# Altium PCB Space_Test_Battery.PcbDoc
Units mm, origin at the board's own origin, x right, y up, seen from the top; angles counter-clockwise.
Board outline 100 x 60 mm, 2 copper layers (Top Layer, Bottom Layer); 59 components, 49 nets, 200 pads, 87 vias.
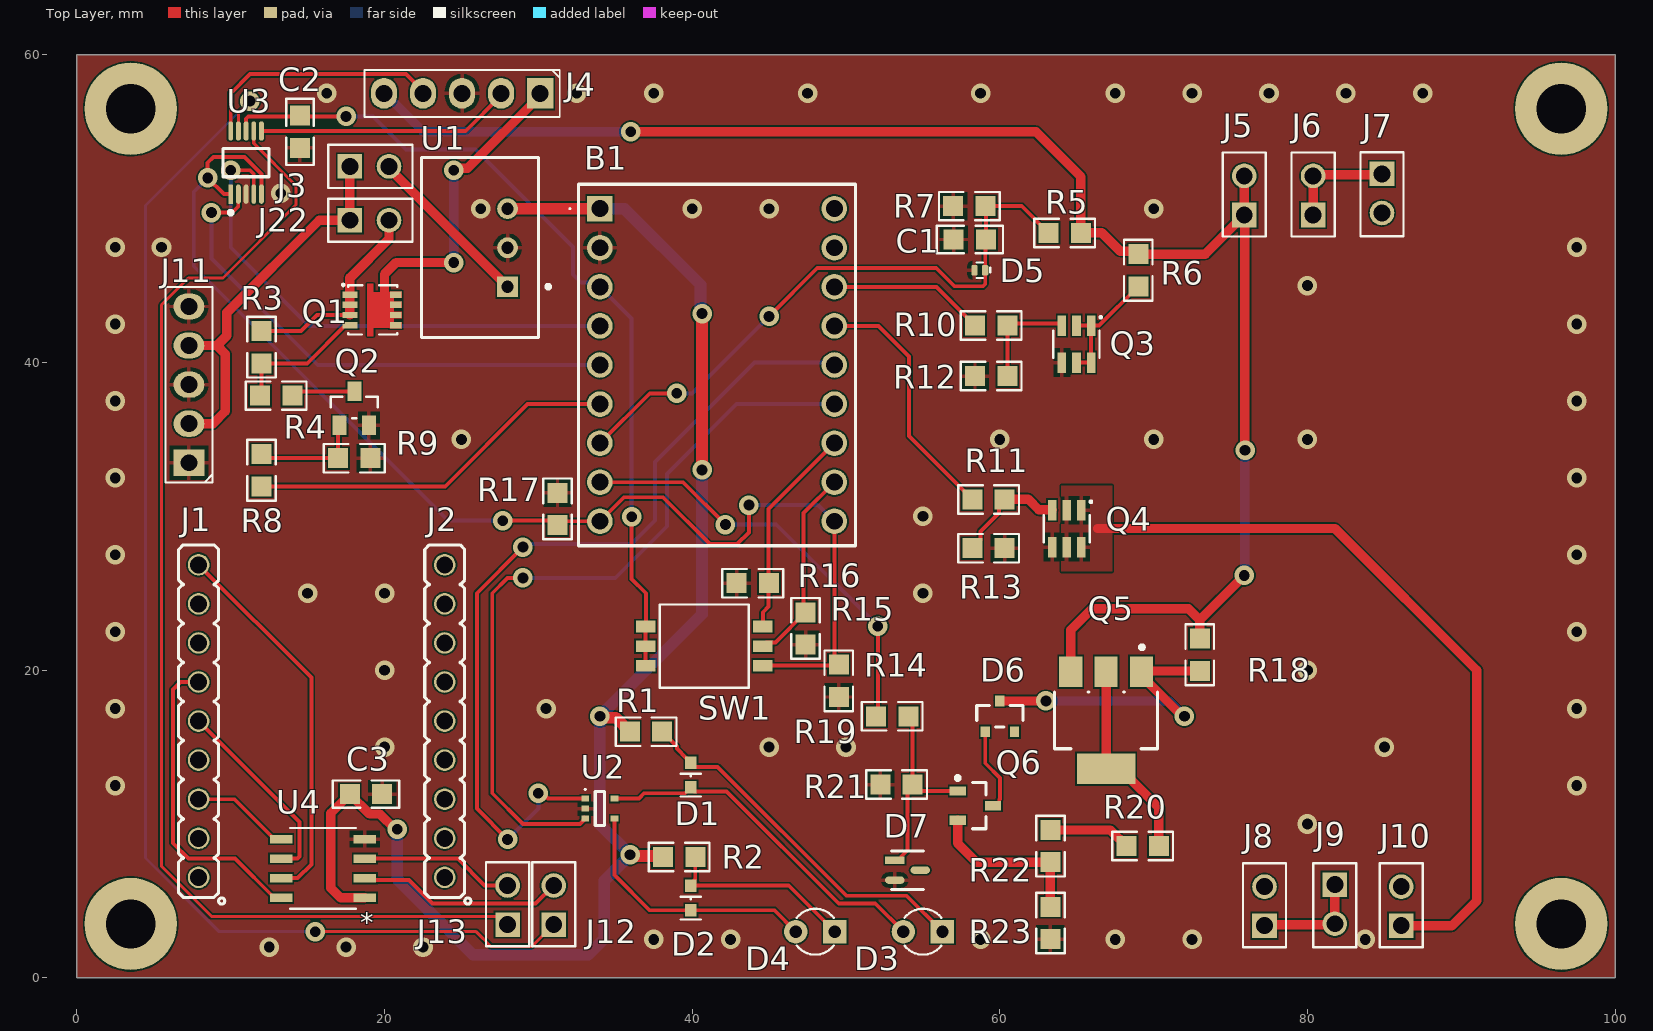
[diagram p0: Top Layer view]
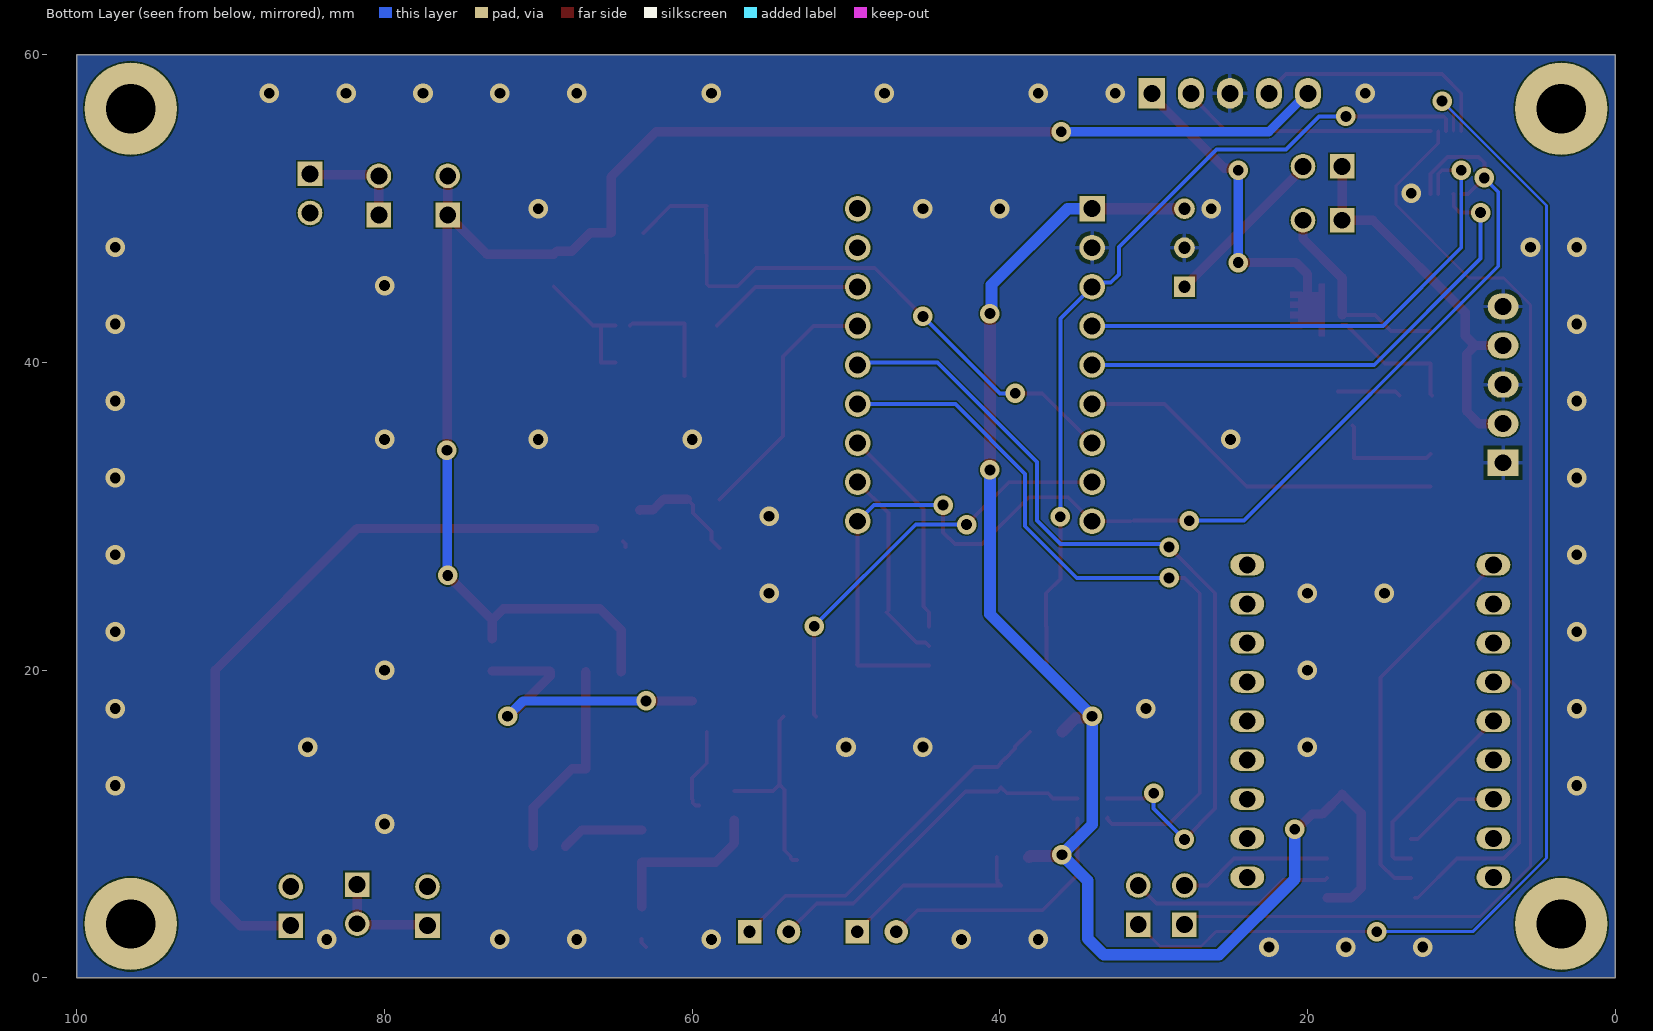
[diagram p1: Bottom Layer view, seen from below]

## Layer stack, top to bottom
Top Solder: solder mask 0.0102, Solder Resist, Dk 3.5
Top Layer: signal copper 0.0356
Dielectric 1: dielectric 0.32, FR-4, Dk 4.8
Bottom Layer: signal copper 0.0356
Bottom Solder: solder mask 0.0102, Solder Resist, Dk 3.5

## Board outline
0,0 0,60 100,60 100,0

## Design rules (kind name [scope] priority, off if disabled: settings)
AssemblyTestPointUsage [All] p1: isadvanced=TRUE
AssemblyTestpoint [All] p1: isadvanced=TRUE testpointundercomponent=TRUE minsize=1.016 maxsize=2.54 preferedsize=1.524 minholesize=0 maxholesize=1.016 preferedholesize=0.813 testpointgrid=0.025 usegrid=TRUE gridtolerance=0 allowsidetop=TRUE allowsidebottom=TRUE
Clearance Clearance_1 [OnMid vs OnMid] p1: gap=0.1 ignorepadtopadclearanceinfootprint=FALSE sourcerule=42 cellrowname=All cellrowtype=0 cellcolname=All cellcoltype=0 innerlayers=TRUE
Clearance Clearance_2 [(ExistsOnLayer('Top Layer') Or ExistsOnLayer('Bottom Layer')) vs (ExistsOnLayer('Top Layer') Or ExistsOnLayer('Bottom Layer'))] p2: gap=0.1 ignorepadtopadclearanceinfootprint=FALSE sourcerule=42 cellrowname=All cellrowtype=0 cellcolname=All cellcoltype=0 outerlayers=TRUE
Clearance [All] p3: gap=0.254 ignorepadtopadclearanceinfootprint=FALSE ismatrix=TRUE
ComponentClearance [All] p1: isadvanced=TRUE gap=0.254 collisioncheckmode=3 verticalgap=0.254 showdistances=FALSE
FabricationTestPointUsage [All] p1: isadvanced=TRUE valid=0 allowmultiple=FALSE
FabricationTestpoint [All] p1: isadvanced=TRUE side=3 testpointundercomponent=TRUE minsize=1.016 maxsize=2.54 preferedsize=1.524 minholesize=0 maxholesize=1.016 preferedholesize=0.813 testpointgrid=0.025 allowsidetop=TRUE allowsidebottom=TRUE usegrid=TRUE gridtolerance=0
FanoutControl Fanout_BGA [IsBGA] p1: isadvanced=TRUE bgadir=Out bgaviamode=Centered fanoutstyle=Auto fanoutdirection=Alternating viagrid=0.025 // Fanout_BGA (Default Rule)
FanoutControl Fanout_LCC [IsLCC] p2: isadvanced=TRUE bgadir=Out bgaviamode=Centered fanoutstyle=Auto fanoutdirection=Alternating viagrid=0.025 // Fanout_LCC (Default Rule)
FanoutControl Fanout_SOIC [IsSOIC] p3: isadvanced=TRUE bgadir=Out bgaviamode=Centered fanoutstyle=Auto fanoutdirection=Alternating viagrid=0.025 // Fanout_SOIC (Default Rule)
FanoutControl Fanout_Small [(CompPinCount < 5)] p4: isadvanced=TRUE bgadir=Out bgaviamode=Centered fanoutstyle=Auto fanoutdirection=OutThenIn viagrid=0.025 // Fanout_Small (Default Rule)
FanoutControl Fanout_Default [All] p5: isadvanced=TRUE bgadir=Out bgaviamode=Centered fanoutstyle=Auto fanoutdirection=Alternating viagrid=0.025 // Fanout_Default (Default Rule)
Height [All] p1: isadvanced=TRUE minheight=0 maxheight=25.4 prefheight=12.7
HoleSize [All] p1: isadvanced=TRUE absolutevalues=TRUE maxlimit=5.08 minlimit=0.025 maxpercent=80.000 minpercent=20.000
HoleToHoleClearance [All] p1: isadvanced=TRUE gap=0.254 allowstackedmicrovias=TRUE
LayerPairs [All] p1: isadvanced=TRUE enforce=TRUE
MinimumSolderMaskSliver [All] p1: isadvanced=TRUE minsoldermaskwidth=0.1
NetAntennae [All] p1: isadvanced=TRUE netantennaetolerance=0
PasteMaskExpansion [All] p1: isadvanced=TRUE expansion=0
PlaneClearance [All] p1: isadvanced=TRUE clearance=0.508
PlaneConnect [All] p1: isadvanced=TRUE planeconnectstyle=Direct reliefexpansion=0.508 reliefentries=4 reliefconductorwidth=0.254 reliefairgap=0.254
PolygonConnect [All] p1: connectstyle=Relief reliefconductorwidth=0.254 reliefentries=4 polygonreliefangle="90 Angle" airgapwidth=0.254
RoutingCorners [All] p1: isadvanced=TRUE cornerstyle=45-Degree minsetback=2.54 maxsetback=2.54
RoutingPriority [All] p1: isadvanced=TRUE routingpriority=0
RoutingVias [All] p1: holewidth=0.711 width=1.27 viastyle="Through Hole" minholewidth=0.711 minwidth=1.27 maxholewidth=0.711 maxwidth=1.27
ShortCircuit [All] p1: isadvanced=TRUE allowed=FALSE
SilkToSilkClearance [All] p1: isadvanced=TRUE silktosilkclearance=0.1
SilkToSolderMaskClearance [IsPad] p1: isadvanced=TRUE minsilkscreentomaskgap=0.1 clearancetoexposedcopper=TRUE
SolderMaskExpansion [All] p1: isadvanced=TRUE expansion=0.102 istentingtop=FALSE
SupplyNets "Schematic Supply Nets_3" [InNet('+5')] p1: isadvanced=TRUE voltage=0.000
SupplyNets "Schematic Supply Nets_2" [InNet('+Batter Input')] p2: isadvanced=TRUE voltage=0.000
SupplyNets "Schematic Supply Nets_1" [InNet('GND')] p3: isadvanced=TRUE voltage=0.000
SupplyNets "Schematic Supply Nets" [InNet('+12')] p4: isadvanced=TRUE voltage=0.000
UnRoutedNet [All] p1: isadvanced=TRUE
UnpouredPolygon [All] p1: isadvanced=TRUE
Width "Schematic Width Constraint_1" [InNetClass('switch')] p1: maxlimit=0.508 minlimit=0.254 preferedwidth=0.305 minimp=50.000000 maximp=50.000000 favimp=50.000000
Width "Schematic Width Constraint" [InNetClass('Power_thy')] p2: maxlimit=0.762 minlimit=0.254 preferedwidth=0.61 minimp=50.000000 maximp=50.000000 favimp=50.000000
Width [All] p3: maxlimit=0.8 minlimit=0.1 preferedwidth=0.254 minimp=50.000000 maximp=50.000000 favimp=50.000000
4 further rules are at their usual default settings.

## Classes and differential pairs
component class UART-USB: C3 J1 J2 J12 J13 U4
net class switch: NetB1_3 NetB1_11 NetB1_12
net class Power_thy: +5 +12 "+Batter Input" NetD6_3 NetJ4_2 NetQ5_2 NetQ6_2 NetR20_1
component class Current_Sink: D6 D7 Q5 Q6 R18 R19 R20 R21 R22 R23
component class ESP32: B1 C1 C2 D1 D2 D3 D4 D5 J3 J4 J5 J6 J7 J8 J9 J10 J11 J22 Q1 Q2 Q3 Q4 R1 R2 R3 R4 R5 R6 R7 R8 R9 R10 R11 R12 R13 R14 R15 R16 R17 SW1 U1 U2 U3

## Components (designator, comment, footprint, x,y, rotation, side; value= is the part's Value field where it differs from the comment)
B1 "ESP32-C6-Zero" ESP32C6Zero 34,50 r0 top
C1 "3.9nF" CAP0805H1520 58.05,48 r0 top
C2 "3.9nF" CAP0805H1520 14.5,55 r90 top
C3 "3.9nF" CAP0805H1520 18.796,11.938 r180 top
D1 "150060VS55040" LEDC160X75X41L40-green(WE) 39.912,13.191 r90 top
D2 "150060VS55040" LEDC160X75X41L40-green(WE) 39.912,5.191 r90 top
D3 "LED 3mm red" LED_THT_3mm 55,3 r90 top
D4 "LED 3mm red" LED_THT_3mm 48,3 r90 top
D5 "CPDV3V3A-HF" SOD882 58.7,46 r180 top
D6 "BZX84-C2.7-215" FP-SOT23-MFG 60,17 r90 top
D7 "BAV99W,135" FP-SOT323-IPC_B 54,7 r0 top
J1 "HDR_M_1X9" HDR_M_1X9 7.912,16.691 r90 top value=HDRM9
J2 "HDR_M_1X9" HDR_M_1X9 23.912,16.691 r90 top value=HDRM9
J3 "5-825433-0_2/50" PIN_HEADER_2_54mm_1_1mm_1x2 17.75,52.75 r0 top
J4 "Header 1x5" "Header 1x5 2.54mm" 30.12,57.5 r180 top
J5 "5-825433-0_2/50" PIN_HEADER_2_54mm_1_1mm_1x2 75.892,49.591 r90 top
J6 "5-825433-0_2/50" PIN_HEADER_2_54mm_1_1mm_1x2 80.368,49.591 r90 top
J7 "5-825433-0_2/50" PIN_HEADER_2_54mm_1_1mm_1x2 84.842,52.262 r270 top
J8 "5-825433-0_2/50" PIN_HEADER_2_54mm_1_1mm_1x2 77.206,3.389 r90 top
J9 "5-825433-0_2/50" PIN_HEADER_2_54mm_1_1mm_1x2 81.778,6.056 r270 top
J10 "5-825433-0_2/50" PIN_HEADER_2_54mm_1_1mm_1x2 86.096,3.389 r90 top
J11 "Header 1x5" "Header 1x5 2.54mm" 7.285,33.484 r90 top
J12 "5-825433-0_2/50" PIN_HEADER_2_54mm_1_1mm_1x2 31,3.46 r90 top
J13 "5-825433-0_2/50" PIN_HEADER_2_54mm_1_1mm_1x2 28,3.46 r90 top
J22 "5-825433-0_2/50" PIN_HEADER_2_54mm_1_1mm_1x2 17.75,49.25 r0 top
Q1 "SI7617DN-T1-GE3" PowerPAK1212-8 19.242,43.42 r0 top
Q2 "2N7002LT3G" SOT23 18.034,37.084 r90 top
Q3 "IRLMS2002" SOT23-6 64.982,41.196 r270 top
Q4 "IRLMS2002" SOT23-6 64.347,29.201 r270 top
Q5 "BCP51" FP-318H-MFG 66.912,16.744 r270 top
Q6 "BCX70G" INF-SOT23_N 58.412,11.191 r0 top
R1 "2k2" RES0805MD 37,16 r180 top
R2 "2k2" RES0805MD 39.153,7.847 r180 top
R3 "36k" RES0805MD 12,41 r90 top value=2k2
R4 "10k" RES0805MD 12.954,37.846 r0 top value=2k2
R5 "20k" RES0805MD 64.212,48.426 r0 top value=2k2
R6 "2k2" RES0805MD 69,46 r270 top
R7 "10k" RES0805MD 58.02,50.165 r0 top value=2k2
R8 "100" RES0805MD 12,33 r90 top value=2k2
R9 "10k" RES0805MD 18.034,33.782 r180 top value=2k2
R10 "220" RES0805MD 59.436,42.418 r0 top value=2k2
R11 "220" RES0805MD 59.267,31.106 r0 top value=2k2
R12 "10k" RES0805MD 59.436,39.116 r0 top value=2k2
R13 "10k" RES0805MD 59.267,27.931 r180 top value=2k2
R14 "10k" RES0805MD 49.53,19.304 r270 top value=2k2
R15 "10k" RES0805MD 47.371,22.714 r270 top value=2k2
R16 "10k" RES0805MD 43.942,25.654 r180 top value=2k2
R17 "10k" RES0805MD 31.242,30.48 r90 top value=2k2
R18 "1k" RES0805MD 73,21 r90 top value=2k2
R19 "1k" RES0805MD 53,17 r180 top value=2k2
R20 "5.6E" RES0805MD 69.285,8.564 r0 top value=2k2
R21 "47k" RES0805MD 53.285,12.564 r0 top value=2k2
R22 "5.6E" RES0805MD 63.285,8.564 r90 top value=2k2
R23 "5.6E" RES0805MD 63.285,3.564 r90 top value=2k2
SW1 "WE_416131160803" WE_416131160803 40.785,21.564 r270 top
U1 "TSR 1-2450" TRACO-SIP-3_V 28,47.46 r90 top
U2 "NSB1706DMW5T1G" ONSC-SC70-5-419A-02_V 34,11 r0 top
U3 "TS5A23157DGSR" FP-DGS0010A-IPC_C 11,53 r90 top
U4 "ISO6721BDR" SOIC_1BDR_TEX 16.002,7.112 r180 top

## Footprints (in the part's own frame and the unit in brackets; to place one, negate y for a bottom-side part, rotate by r counter-clockwise, add the part's x,y. Pads: shape width x height; smd on the part's side, far side on the other; paste and mask are expansions set on the pad)
CAP0805H1520 [mm] "Chip Capacitor 0805, 2-Leads, Body 2,00x1,25mm, IPC Medium Density"
  rect 1.3x1.3 smd: 1(-1.05,0) 2(1.05,0)
  silkscreen extent -2.16,-0.89 2.16,0.89, body extent -1.05,-0.67 1.05,0.68, height 1.52
ESP32C6Zero [mm]
  rect 1.665x1.665 hole 1.1: 1(0,0)
  round 1.665 hole 1.1: 2(0,-2.54) 3(0,-5.08) 4(0,-7.62) 5(0,-10.16) 6(0,-12.7) 7(0,-15.24) 8(0,-17.78) 9(0,-20.32) 10(15.24,-20.32) 11(15.24,-17.78) 12(15.24,-15.24) 13(15.24,-12.7) 14(15.24,-10.16) 15(15.24,-7.62) 16(15.24,-5.08) 17(15.24,-2.54) 18(15.24,0)
  silkscreen extent -2,-21.91 16.62,1.59
FP-318H-MFG [mm]
  rect 2x1.5 smd paste+0 mask+0: 1(-3.15,2.3) 2(-3.15,0) 3(-3.15,-2.3)
  rect 2x3.8 smd paste+0 mask+0: 4(3.15,0)
  silkscreen extent -4.87,-3.35 1.85,3.35, body extent -4.25,-3.68 4.25,3.68, height 0.25
FP-DGS0010A-IPC_C [mm]
  rect 1.257x0.312 smd paste+0 mask+0: 1(-2.051,1)
  rrect100% 1.257x0.312 smd paste+0 mask+0: 2(-2.051,0.5) 3(-2.051,0) 4(-2.051,-0.5) 5(-2.051,-1) 6(2.051,-1) 7(2.051,-0.5) 8(2.051,0) 9(2.051,0.5) 10(2.051,1)
  silkscreen extent -3.38,-1.5 0.92,1.5
FP-SOT23-MFG [mm]
  rect 0.7x0.6 smd paste-1000 mask+0: 1(-1,0.95) 2(-1,-0.95) 3(1,0)
  silkscreen extent -0.7,-1.5 0.7,1.5, body extent -1.5,-1.65 1.5,1.65, height 0.25
FP-SOT323-IPC_B [mm]
  rect 1.259x0.482 smd paste+0 mask+0: 1(-0.827,0.65)
  rrect100% 1.259x0.482 smd paste+0 mask+0: 2(-0.827,-0.65) 3(0.827,0)
  silkscreen extent -1.05,-1.25 1.05,1.25
HDR_M_1X9 [mm] "Connector; Header; 9 Position"
  round 1.4 / inner round 1.4 / far side oval 1.4x2.2 hole 1.1 mask+0.1: 1(-10.16,0) 2(-7.62,0) 3(-5.08,0) 4(-2.54,0) 5(0,0) 6(2.54,0) 7(5.08,0) 8(7.62,0) 9(10.16,0)
  silkscreen extent -11.9,-1.7 11.46,1.3, body extent -11.43,-1.3 11.43,1.19, height 8.54
"Header 1x5 2.54mm" [mm]
  rect 1.7x2 hole 1.1: 1(0,0)
  oval 1.7x2 hole 1.1: 2(2.54,0) 3(5.08,0) 4(7.62,0) 5(10.16,0)
  silkscreen extent -1.27,-1.52 11.43,1.52, body extent -1.27,-1.27 11.43,1.27, height 8.54
INF-SOT23_N [mm] "SOT23, 3-Leads, Body 2.9x1.3 mm, Pitch 0.95 mm, IPC Medium Density"
  rect 1.05x0.6 smd: 1(-1.15,0.95) 2(-1.15,-0.95) 3(1.15,0)
  silkscreen extent -1.27,-1.5 0.7,1.92, body extent -0.7,-1.5 0.7,1.5, height 1.1
LED_THT_3mm [mil] "THT LED 3mm, 2-Leads"
  rect 60x60 hole 31.5: 1(0,-50)
  round 60 hole 31.5: 2(0,50)
  silkscreen extent -59,-47 59,47, body extent -75,-75 75,63, height 256
LEDC160X75X41L40-green(WE) [mm] "Osram"
  rect 0.8x0.75 smd: 1(-0.8,0) 2(0.8,0)
  silkscreen extent -1.4,-0.65 0.08,0.65, body extent -0.8,-0.4 0.8,0.4, height 0.4
ONSC-SC70-5-419A-02_V [mm] "SOT23, 5-Leads, Body 2x1.25mm, Pitch 0.65mm"
  rect 0.5x0.4 smd: 1(-0.95,0.65) 2(-0.95,0) 3(-0.95,-0.65) 4(0.95,-0.65) 5(0.95,0.65)
  silkscreen extent -1,-1.1 0.3,1.3, body extent -0.63,-1 0.63,1, height 1.1
PIN_HEADER_2_54mm_1_1mm_1x2 [mm] "Stiftleiste 1x2 THT Pitch 2.54mm"
  rect 1.6x1.6 hole 1.1: 1(0,0)
  round 1.6 hole 1.1: 2(2.54,0)
  silkscreen extent -1.4,-1.4 4.06,1.4, body extent -1.22,-1.26 3.86,1.28, height 8.54
PowerPAK1212-8 [mm] "SOIC, 8-Leads, Body 4,90x3,90mm, Pitch 1,27mm, IPC Medium Density"
  rect 0.99x0.405 smd paste-0.05: 1(-1.492,0.99) 2(-1.492,0.33) 3(-1.492,-0.33) 4(-1.492,-0.99)
  rect 0.76x0.405 smd paste-0.05: 5(1.493,-0.99) 6(1.493,-0.33) 7(1.493,0.33) 8(1.493,0.99)
  Top Layer region: 1.873,1.194 1.873,1.194 1.112,1.194 1.112,1.152 0.038,1.152 0.038,1.702 -0.362,1.702 -0.362,-1.698 0.038,-1.698 0.038,-1.148 1.112,-1.148 1.112,-1.191 1.873,-1.191 1.872,-0.786 1.873,-0.786 1.363,-0.786 1.363,-0.531 1.363,-0.531 1.872,-0.531 1.872,-0.126 1.855,-0.126 1.363,-0.126 1.363,0.129 1.872,0.129 1.872,0.534 1.363,0.534 1.363,0.789 1.873,0.789 1.873,1.194
  silkscreen extent -1.93,-1.6 1.57,1.63, body extent -1.57,-1.57 1.57,1.57, height 1.17
RES0805MD [mm]
  rect 1.3x1.3 smd: 1(-1.05,0) 2(1.05,0)
  silkscreen extent -1.98,-0.93 1.98,0.93, body extent -1,-0.7 1,0.7, height 0.5
SOD882 [mm] "SON, 2-Leads, Body 0,59x0,99mm, Pitch 0,65mm, IPC Medium Density"
  rrect50% 0.4x0.7 smd paste-0.05 mask+0.05: 1(-0.35,0) 2(0.35,0)
  silkscreen extent -0.67,-0.5 0.2,0.5, body extent -0.51,-0.31 0.51,0.31, height 0.5
SOIC_1BDR_TEX [mm]
  rect 1.455x0.558 smd paste+0 mask+0: 1(-2.721,1.905) 2(-2.721,0.635) 3(-2.721,-0.635) 4(-2.721,-1.905) 5(2.721,-1.905) 6(2.721,-0.635) 7(2.721,0.635) 8(2.721,1.905)
  silkscreen extent -2.12,-2.63 2.12,2.63, body extent -3.1,-2.5 3.1,2.5, height 1.76
SOT23 [mil] "SOT23, 3-Leads, Body 2,92x2,37mm, Pitch 0,95mm, IPC Medium Density"
  rect 50x36 smd paste-18 mask+1.97: 1(-46,37.5) 2(-46,-37.5) 3(41,0)
  silkscreen extent -28,-60 28,60, body extent -48,-55 48,55, height 43
SOT23-6 [mm] "SOT23, 6-Leads, Body 2,90x2,80mm, Pitch 0,95mm, IPC Medium Density"
  rect 1.33x0.56 smd paste-0.28 mask+0.05: 1(-1.2,0.95) 2(-1.2,0) 3(-1.2,-0.95) 4(1.2,-0.95) 5(1.2,0) 6(1.2,0.95)
  silkscreen extent -1.82,-1.5 0.87,1.65, body extent -1.4,-1.45 1.4,1.45, height 1.45
TRACO-SIP-3_V [mm] "SIP, 3-Leads, Body 11.7x7.6mm, Pitch 2.54mm"
  rect 1.35x1.35 hole 0.8 paste-2539.97: 1(-2.54,0)
  round 1.35 hole 0.8 paste-2539.97: 2(0,0) 3(2.54,0)
  silkscreen extent -5.84,-2.77 5.86,5.6, body extent -5.84,-2 5.86,5.6, height 10.2
WE_416131160803 [mm] "DIP Switch tripple, Wuerth 416131160803"
  rect 0.76x1.27 smd: 1(-1.27,-3.81) 2(-1.27,3.81) 3(0,-3.81) 4(0,3.81) 5(1.27,-3.81) 6(1.27,3.81)
  silkscreen extent -2.7,-2.9 2.7,2.9, body extent -2.42,-4 2.42,4, height 2.11

## Part data
B1: "ESP32-C6 Mini Development Board, Based on ESP32-C6FH4, Dual Processors, 160MHz Running Frequency, 2.4GHz WiFi 6 & Bluetooth 5, ESP32 Development Board", Manufacturer_Name=Waveshare, Datasheet Link=https://www.waveshare.com/esp32-c6-zero.htm, Geometry.Height=5.5mm, Manufacturer_Part_Number=ESP32-C6-Zero
C1 C2 C3: library part UID-1DC189D77836E3ADB330, "CAP 3.9nF 5% C0G 50V", Manufacturer="KYOCERA AVX", Manufacturer Part Number=08055A392JAT2A, Package / Case=0805, SAP-Partnumber=35031280, Temperature - Rated="-55 °C to +125 °C", Tolerance=5%, Voltage - Rated=50V, Category=Ceramic, Compliance=RoHS2, ComponentLink1Description=Datasheet, ComponentLink1URL=https://code.bbraun.io/BA-RD-EE/altium-partlib/raw/main/components/datasheets/35031280_SMD_KOND-KER_3,9NF_5Proz_50V_C0G_0805/AVX_datasheet_C0GNP0-Dielectric.pdf, ComponentLink2Description="Compliance Certificate", ComponentLink2URL=https://code.bbraun.io/BA-RD-EE/altium-partlib/raw/main/components/datasheets/35031280_SMD_KOND-KER_3,9NF_5Proz_50V_C0G_0805/AVX_datasheet_C0GNP0-Dielectric.pdf, ComponentLink3Description="Datasheet Folder", ComponentLink3URL=https://code.bbraun.io/BA-RD-EE/altium-partlib/raw/main/components/datasheets/35031280_SMD_KOND-KER_3,9NF_5Proz_50V_C0G_0805/, ComponentLink4Description="Data Sheet Library", ComponentLink4URL=http://ais.development.bbraun.com/dsl/35031280, Creation Date=22.05.2023, Creator=weirmade, Last Updated=22.05.2023, Library Status=Production, Lifecycle Status=Active, Maximum Height="1.52 mm", partid=60, Price@1k="0,01183 €", Review Date=07.06.2025, Reviewer=hoersede, Supplier 1=Mouser, Supplier 2=Digikey, Supplier 3="RS Components", Supplier 4=Farnell, Technology=SMT, Type=C0G, uid=UID-1DC189D77836E3ADB330
D1 D2: library part UID-108CCBCADD5F52F6FAD1, "Led Green 0603 SMD", Current Rated=20mA, Manufacturer="Würth Elektronik", Package / Case=0603, SAP-Partnumber=35146000, Supplier Part Number 1=710-150060VS55040, Temperature - Rated="-40 °C to +85 °C", Voltage - Rated=2.4V, Category=LED, Compliance=RoHS, ComponentLink1Description=Datasheet, ComponentLink1URL=https://code.bbraun.io/BA-RD-EE/altium-partlib/raw/main/components/datasheets/35146000_SMD_LED-Green_0603/35146000_Wuerth_150060VS55040_Datasheet.pdf, ComponentLink2Description="Compliance Certificate", ComponentLink2URL=https://code.bbraun.io/BA-RD-EE/altium-partlib/raw/main/components/datasheets/35146000_SMD_LED-Green_0603/35146000_Wuerth_150060VS55040_ROHS_REACH.pdf, ComponentLink3Description="Datasheet Folder", ComponentLink3URL=https://code.bbraun.io/BA-RD-EE/altium-partlib/raw/main/components/datasheets/35146000_SMD_LED-Green_0603/, ComponentLink4Description="Data Sheet Library", ComponentLink4URL=http://ais.development.bbraun.com/dsl/35146000, Creation Date=21.05.2022, Creator="GEG DF,GK", Last Updated=15.01.2026, Library Status=Prototype, Lifecycle Status=Active, Manufacturer Part Number=150060VS55040, Maximum Height="0.5 mm", partid=61, Price@1k="0,033 €", Remark=NGX, Review Date=08.06.2025, Reviewer=hoersede, Supplier 1=Mouser, Supplier 2=Digikey, Supplier 3="RS Components", Supplier 4=Farnell, Supplier Part Number 2=732-12017-2-ND, Supplier Part Number 3=1766157, Supplier Part Number 4=2900765RL, Technology=SMT, uid=UID-108CCBCADD5F52F6FAD1
D3 D4: library part UID-E12BBC48C07D2EA352E9, "LED Red, 625 nm, GaAsP/GaP, THT, 3mm", BBPUC-Partnumber=-, Current Rated="20 mA", Manufacturer=TruComponents, Manufacturer Part Number=TC-9510472, Package / Case=3mm, Supplier Part Number 1="2377618 - 62", Temperature - Rated="-40 °C to + 85 °C", Voltage - Rated=5V, Category=LED, ComponentLink1Description=Datasheet, ComponentLink1URL=https://code.bbraun.io/BA-RD-EE/altium-partlib/raw/main/components/datasheets/UID-E12BBC48C07D2EA352E9_LED_3mm_Red_THT/3mm_LED_Datasheet.pdf, ComponentLink2Description="Compliance Certificate", ComponentLink3Description="Datasheet Folder", ComponentLink3URL=https://code.bbraun.io/BA-RD-EE/altium-partlib/raw/main/components/datasheets/UID-E12BBC48C07D2EA352E9_LED_3mm_Red_THT/, ComponentLink4Description="Data Sheet Library", Creation Date=22.04.2026, Creator=palmfrde, Library Status=New, Lifecycle Status=Active, Maximum Height="6.3 mm", partid=106, Price@1k="0,18 €", Remark=EPG, Supplier 1=Conrad, Supplier 2=Digikey, Supplier 3="RS Components", Supplier 4=Farnell, Technology=THT, uid=UID-E12BBC48C07D2EA352E9
D5: library part UID-3D03554C99A7E31313F8, "Unidirectional ESD protection diode", BBPUC-Partnumber=2838.332, Current Rated=15A, Manufacturer=Nexperia, Manufacturer Part Number=PESD3V3S1UL, Package / Case=SOD882, SAP-Partnumber=35140169, Temperature - Rated="-55 °C to +150 °C", Voltage - Rated=3.3V, Category="ESD Diode", Compliance=RoHS2, ComponentLink1Description=Datasheet, ComponentLink1URL=https://code.bbraun.io/BA-RD-EE/altium-partlib/raw/main/components/datasheets/35140169_SMD_Diode_ESD_PESD3V3S1UL_SOD882/PESD3V3S1UL.pdf, ComponentLink2Description="Compliance Certificate", ComponentLink2URL=https://code.bbraun.io/BA-RD-EE/altium-partlib/raw/main/components/datasheets/35140169_SMD_Diode_ESD_PESD3V3S1UL_SOD882/Nexperia_-_Statement_on_RoHS_082019.pdf, ComponentLink3Description="Datasheet Folder", ComponentLink3URL=https://code.bbraun.io/BA-RD-EE/altium-partlib/raw/main/components/datasheets/35140169_SMD_Diode_ESD_PESD3V3S1UL_SOD882/, ComponentLink4Description="Data Sheet Library", ComponentLink4URL=http://ais.development.bbraun.com/dsl/35140169, Creation Date=16.05.2023, Creator=hoersede, Last Updated=22.06.2023, Library Status=Prototype, Lifecycle Status=Active, Maximum Height="0.5 mm", partid=43, Price@1k="0,0247 €", Review Date=08.06.2025, Reviewer=hoersede, Supplier 1=Mouser, Supplier 2=Digikey, Supplier 3="RS Components", Supplier 4=Farnell, uid=UID-3D03554C99A7E31313F8
D6: library part CMP-14400-000001-1, "DIODE ZENER 2,7V 250MW SOT23", Ambient Temperature Range High=+150°C, Forward Current=200mA, Manufacturer=Nexperia, Manufacturer Part Number=BZX84-C20,215, Max Reverse Leakage Current=0.05uA, Max Zener Voltage=21.2V, Nom Zener Voltage=20V, Package=SOT23, Power Dissipation=250mW, Reverse Voltage=14V, Temperature="-65°C to +150°C", Temperature Range Low=-65°C, Automotive=Yes, Automotive Grade="Grade 0", Category=Diode, ComponentLink2Description=Datasheet, ComponentLink2URL=https://assets.nexperia.com/documents/data-sheet/BZX84_SER.pdf, Device Class L1="Discrete Semiconductors", Device Class L2=Diodes, Device Class L3="Zener Diodes", Digikey Description="DIODE ZENER 20V 250MW SOT23", Footprint Url=https://assets.nexperia.com/documents/outline-drawing/SOT23.pdf, Height=1.1mm, Ipc Land Pattern Name=SOT95P230X100-3, Lead Free=Yes, Max Junction Temp=+150°C, Mouser Description="Diode Zener Single 20V 5% 250mW Automotive 3-Pin SOT-23 T/R", Octopart=https://octopart.com/bzx84-c20%2C215-nexperia-78740231, RoHS=TRUE, Temperature Range High=+150°C, Zener Impedance=15Ω
D7: library part CMP-14399-000011-1, "DIODE ARRAY GP 100V 150MA SOT323"
J1 J2: library part CMP-002-00798-1, Component Type=Standard, Design Item ID=HDR_M_1X9, Pins=9, Source="Conn Header.SchLib"
J3 J5 J6 J7 J8 J9 J10 J12 J13 J22: library part UID-C948C1FBE4D127CA7C47, "THT Pin Header, 1x2, 2.54mm, stehend", Current Rated=5A, Manufacturer="TE Connectivity", Manufacturer Part Number=5-825433-0, SAP-Partnumber=33193339, Temperature - Rated="-65 °C to + 105 °C", Voltage - Rated=750Vrms, Category="Pin Header", Compliance=RoHS2, ComponentLink1Description=Datasheet, ComponentLink1URL=https://code.bbraun.io/BA-RD-EE/altium-partlib/raw/main/components/datasheets/33193339_PIN_HEADER_2_54mm_1x50_TE/product-5-825433-0.datasheet.pdf, ComponentLink2Description="Compliance Certificate", ComponentLink2URL=https://code.bbraun.io/BA-RD-EE/altium-partlib/raw/main/components/datasheets/33193339_PIN_HEADER_2_54mm_1x50_TE/product-5-825433-0.datasheet.pdf, ComponentLink3Description="Datasheet Folder", ComponentLink3URL=https://code.bbraun.io/BA-RD-EE/altium-partlib/raw/main/components/datasheets/33193339_PIN_HEADER_2_54mm_1x50_TE, ComponentLink4Description="Data Sheet Library", ComponentLink4URL=http://ais.development.bbraun.com/dsl/33193339, Contacts=2, Creation Date=09.02.2023, Creator=sifngu01, Last Updated=22.06.2023, Library Status=Prototype, Lifecycle Status=Active, Maximum Height="8.54 mm", partid=27, Price@1k="1,65 €", Review Date=12.06.2024, Reviewer=vaupmide, Supplier 1=Mouser, Supplier 2=Digikey, Supplier 3="RS Components", Supplier 4=Farnell, uid=UID-C948C1FBE4D127CA7C47
J4 J11: library part CMP-002-00275-1, "Header 1x5 2.54mm", Design Item ID="Header 1x5", Source=Header.SchLib
Q1: library part UID-FE97C754B092DB379145, "FET P-CH", Current - Rated="35 A", Manufacturer=Vishay, Package / Case=PowerPAK1212-8, SAP-Partnumber=35140024, Supplier Part Number 1=781-SI7617DN-GE3, Temperature - Rated="-55 °C to +150 °C", Voltage - Rated=30V, Category="FET p-Ch", Compliance=RoHS3, ComponentLink1Description=Datasheet, ComponentLink1URL=https://code.bbraun.io/BA-RD-EE/altium-partlib/raw/main/components/datasheets/35140024_SMD_Transistor_P-Channel_Si7617DN/Datasheet_SI7617DN.pdf, ComponentLink2Description="Compliance Certificate", ComponentLink2URL=https://code.bbraun.io/BA-RD-EE/altium-partlib/raw/main/components/datasheets/35140024_SMD_Transistor_P-Channel_Si7617DN/Compliance/VISH-E-A0015053004-1.pdf, ComponentLink3Description="Datasheet Folder", ComponentLink3URL=https://code.bbraun.io/BA-RD-EE/altium-partlib/raw/main/components/datasheets/35140024_SMD_Transistor_P-Channel_Si7617DN/, ComponentLink4Description="Data Sheet Library", ComponentLink4URL=http://ais.development.bbraun.com/dsl/35140024, Creation Date=04.08.2023, Creator=mochalde, Last Updated=28.11.2023, Library Status=Prototype, Lifecycle Status=Active, Manufacturer Part Number=SI7617DN-T1-GE3, Maximum Height="1.17 mm", partid=22, Price@1k="0,2450 €", RDS-on=0.0123R, Review Date=08.07.2024, Reviewer=vaupmide, Supplier 1=Mouser, Supplier 2=Digikey, Supplier 3="RS Components", Supplier 4=Farnell, Supplier Part Number 2=SI7617DN-T1-GE3TR-ND, Technology=SMT, uid=UID-FE97C754B092DB379145
Q2: library part UID-746324AF67844B7863CB, "N-Channel MOSFET 60V 115m, SMD SOT23-3", Current - Rated="115 mA", Manufacturer=onsemi, Package / Case=SOT-23, SAP-Partnumber=35140038, Supplier Part Number 1=863-2N7002LT3G, Temperature - Rated="-55 °C to +150 °C", Voltage - Rated=60V, Category="FET n-Ch", Compliance=RoHS, ComponentLink1Description=Datasheet, ComponentLink1URL=https://code.bbraun.io/BA-RD-EE/altium-partlib/raw/main/components/datasheets/35140038_SMD_MOSFET-N-Chanel_2N7002L_SOT23/Onsemi_2N7002LT3G.PDF, ComponentLink2Description="Compliance Certificate", ComponentLink2URL=https://code.bbraun.io/BA-RD-EE/altium-partlib/raw/main/components/datasheets/35140038_SMD_MOSFET-N-Chanel_2N7002L_SOT23/Compliance/RoHS-Compliance_2N7002LT3G.png, ComponentLink3Description="Datasheet Folder", ComponentLink3URL=https://code.bbraun.io/BA-RD-EE/altium-partlib/raw/main/components/datasheets/35140038_SMD_MOSFET-N-Chanel_2N7002L_SOT23/, ComponentLink4Description="Data Sheet Library", ComponentLink4URL=http://ais.development.bbraun.com/dsl/35140038, Creation Date=22.04.2022, Creator="GEG DF,GK", Last Updated=10.01.2024, Library Status=Prototype, Lifecycle Status=Active, Manufacturer Part Number=2N7002LT3G, Maximum Height="1.1 mm", partid=17, Price@1k="0,235 €", RDS-on=7R5, Remark=NGX, Review Date=08.07.2024, Reviewer=vaupmide, Supplier 1=Mouser, Supplier 2=Digikey, Supplier 3="RS Components", Supplier 4=Farnell, Supplier Part Number 2=2N7002LT3GOSTR-ND, Technology=SMT, uid=UID-746324AF67844B7863CB
Q3 Q4: library part UID-A18DAACDD2725A595700, "FET N-Ch", Current Rated=6.5A, Manufacturer=Infineon, Manufacturer Part Number=IRLMS2002TRPBF, Package / Case=SOT23, SAP-Partnumber=35140704, Temperature - Rated="-55 °C to +150 °C", Voltage - Rated=20V, Category="FET n-Ch", Compliance=RoHS2, ComponentLink1Description=Datasheet, ComponentLink1URL=https://code.bbraun.io/BA-RD-EE/altium-partlib/raw/main/components/datasheets/35140704_SMD_TRANSISTOR_N-KANAL_IRLMS2002_SOT-23/Infineon_datasheet_IRLMS2002-v01_01.pdf, ComponentLink2Description="Compliance Certificate", ComponentLink2URL=https://code.bbraun.io/BA-RD-EE/altium-partlib/raw/main/components/datasheets/35140704_SMD_TRANSISTOR_N-KANAL_IRLMS2002_SOT-23/Infineon_datasheet_IRLMS2002-v01_01.pdf, ComponentLink3Description="Datasheet Folder", ComponentLink3URL=https://code.bbraun.io/BA-RD-EE/altium-partlib/raw/main/components/datasheets/35140704_SMD_TRANSISTOR_N-KANAL_IRLMS2002_SOT-23/, ComponentLink4Description="Data Sheet Library", ComponentLink4URL=http://ais.development.bbraun.com/dsl/35140704, Creation Date=18.08.2022, Creator=weirmade, Library Status=Production, Lifecycle Status=Active, Maximum Height="1.45 mm", partid=7, Price@1k="0,0751 €", RDS-on=0.03R, Review Date=07.06.2025, Reviewer=hoersede, Supplier 1=Mouser, Supplier 2=Digikey, Supplier 3="RS Components", Supplier 4=Farnell, uid=UID-A18DAACDD2725A595700
Q5: library part CMP-00278-84324633-1, "BCP51 Trans Gp Bjt PNP 45V 1.5A 1000MW 4-PIN(3+TAB) SOT-223 T/r / Trans PNP 45V 1.5A SOT-223", Case/Package=SOT-223, Collector Base Voltage (VCBO)=-45V, Collector Emitter Saturation Voltage=-500mV, Emitter Base Voltage (VEBO)=-5V, Manufacturer Lifecycle Status=OBSOLETE, Max Collector Current=-1.5A, Max Junction Temperature (Tj)=150°C, Min Operating Temperature=-55°C, Power Dissipation=1W, Collector Emitter Breakdown Voltage=-45V, Collector Emitter Voltage (VCEO)=-45V, Height=1.8mm, hFE Min=40, Lead Free="Lead Free", Lifecycle Status=Obsolete, Max Operating Temperature=150°C, NexarPartId=84324633, Number of Elements=1, Number of Pins=3, Polarity=PNP, RoHS=Compliant, Schedule B="8541290080, 8541290080"
Q6: library part CMP-1177-00052-1, "NPN Silicon AF Transistor, 45 V VCEO, 100 mA IC, SOT23, Reel, Green", Manufacturer=Infineon, ComponentLink1Description="Manufacturer URL", ComponentLink1URL=http://www.infineon.com/, ComponentLink2Description=Datasheet, ComponentLink2URL=http://www.infineon.com/dgdl/bcw60_bcx70.pdf?folderId=db3a304314dca389011541d30fa21656&fileId=db3a304314dca38901154219c9141726, ComponentLink3Description="Package Specification", ComponentLink3URL=http://www.infineon.com/dgdl/SOT23-Package_Overview.pdf?folderId=db3a30431936bc4b0119532290053c66&fileId=db3a30431936bc4b0119533468123c85, F (typ)="2 dB", fT (typ)="250Â MHz", Green=TRUE, IBM (max)="200Â mA", IC (max)="100Â mA", ICBO (max)="20Â nA", ICM (max)="200Â mA", Mounting Technology="Surface Mount", PackageDescription="3-Pin Small Outline Transistor Package, 1.3 x 2.9 mm Body, 0.95 mm Pitch", PackageReference=SOT23, PackageVersion=Apr-08, Packing=Reel, PartNumber=BCX70G, Polarity=NPN, Ptot (max)="330Â mW", VCBO (max)="45Â V", VCEO (max)="45Â V", VEBO (max)="6Â V"
R1 R2 R3 R4 R5 R6 R7 R8 R9 R10 R11 R12 R13 R14 R15 R16 R17 R18 R19 R20 R21 R22 R23: library part UID-0F2DF2513351442B7CD8, "RES 2K2 1% 125mW 0805", Manufacturer=Yageo, Manufacturer Part Number=RC0805FR-132K2L, Package / Case=0805, Power - Rated=125mW, SAP-Partnumber=35110490, Supplier Part Number 1=603-RC0805FR-132K2L, Temperature - Rated="-55 °C to +155 °C", Temperature Coefficient=TC100, Tolerance=1%, Voltage - Rated=150V, Compliance=RoHS, ComponentLink1Description=Datasheet, ComponentLink1URL=https://code.bbraun.io/BA-RD-EE/altium-partlib/raw/main/components/datasheets/35110490_SMD_Widerstand_2K2_1Proz_0805/Yageo_RC0805FR-132K2L.pdf, ComponentLink2Description="Compliance Certificate", ComponentLink2URL=https://code.bbraun.io/BA-RD-EE/altium-partlib/raw/main/components/datasheets/35110490_SMD_Widerstand_2K2_1Proz_0805/Yageo_RC0805FR-132K2L.pdf, ComponentLink3Description="Datasheet Folder", ComponentLink3URL=https://code.bbraun.io/BA-RD-EE/altium-partlib/raw/main/components/datasheets/35110490_SMD_Widerstand_2K2_1Proz_0805/, ComponentLink4Description="Data Sheet Library", ComponentLink4URL=http://ais.development.bbraun.com/dsl/35110490, Creation Date=22.04.2022, Creator="GEG DF,GK", Last Updated=22.06.2023, Library Status=New, Lifecycle Status=Active, Maximum Height="0.6 mm", partid=156, Price@1k="0,0075 €", Remark=NGX, Review Date=10.03.2026, Reviewer=hoersede, Supplier 1=Mouser, Supplier 2=Digikey, Supplier 3="RS Components", Supplier 4=Farnell, Supplier Part Number 2=13-RC0805FR-132K2LTR-ND, Technology=SMT, Type="Thick Film", uid=UID-0F2DF2513351442B7CD8
SW1: library part UID-1051BDF3C131CE8C09EA, "SMD DIP-Switch tripple 1.27mm pitch", Manufacturer="Würth Elektronik", Manufacturer Part Number=416131160803, Supplier Part Number 1=710-416131160803, Temperature - Rated="-40 °C to +85 °C", Category="DIP Switch", Compliance=RoHS, ComponentLink1Description=Datasheet, ComponentLink1URL=https://code.bbraun.io/BA-RD-EE/altium-partlib/raw/main/components/datasheets/UID-1051BDF3C131CE8C09EA_DIP-Switch_Wuerth_416131160803/Wuerth_416131160803.pdf, ComponentLink2Description="Compliance Certificate", ComponentLink2URL=https://code.bbraun.io/BA-RD-EE/altium-partlib/raw/main/components/datasheets/UID-1051BDF3C131CE8C09EA_DIP-Switch_Wuerth_416131160803/Wuerth_416131160803.pdf, ComponentLink3Description="Datasheet Folder", ComponentLink3URL=https://code.bbraun.io/BA-RD-EE/altium-partlib/raw/main/components/datasheets/UID-1051BDF3C131CE8C09EA_DIP-Switch_Wuerth_416131160803/, ComponentLink4Description="Data Sheet Library", Creation Date=11.02.2025, Creator=ostemcde, Maximum Height="2.65 mm", partid=30, Price@1k="1,76 €", Supplier 1=Mouser, Supplier 2=Digikey, Supplier 3="RS Components", Supplier 4=Farnell, Supplier Part Number 2=732-416131160803TR-ND, Supplier Part Number 3=254-1753, Technology=SMT, uid=UID-1051BDF3C131CE8C09EA
U1: library part CMP-2000-05427-1, "DC/DC converter, 5 VDC, 1000 mA, -40 to 85 degC, 3-Pin SIP, RoHS", Input Voltage DC Max=36V, Input Voltage DC Min=6.5V, Manufacturer=Tracopower, Output Current Max=1A, Output Power Max=5W, Output Voltage Nom.=5V, Package Description="3-Pin Single In-line Package, Body 11.7 x 7.6 mm, Pitch 2.54 mm", Package Reference=SIP-3, Approvals & Standards=IEC,UL, Datasheet URL=https://datasheet.ciiva.com/6815/tsr1-6815641.pdf, Datasheet Version=Jan-15, DC / DC Converter Mounting=ThroughHole, DC / DC Converter Output Type=Fixed, DC / DC Converter Type=SIP, Depth=11.7mm, Height=10.2mm, Manufacturer URL=http://www.tracopower.com/home, No. of Outputs=1Output, Product Range=TSR-1Series, Width=7.6mm
U2: library part CMP-0630-00174-1, "Dual Bias Resistor Transistors, NPN Silicon Surface Mount Transistor, 5-Pin SC70, Pb-Free, Tape and Reel", Manufacturer="On Semiconductor", ComponentLink1Description="Manufacturer URL", ComponentLink1URL=http://www.onsemi.com/, ComponentLink2Description=Datasheet, ComponentLink2URL=http://www.onsemi.cn/pub_link/Collateral/NSB1706DMW5T1-D.PDF, ComponentLink3Description="Package Specification", ComponentLink3URL=http://www.onsemi.cn/pub_link/Collateral/419A-02.PDF, DatasheetVersion="Rev. 5", hFE Min=80, IC Continuous (A)=0.1, Mounting Technology="Surface Mount", PackageDescription="5-Pin Small Outline Transistor, Body 2 x 1.25 mm, Pitch 0.65 mm", PackageReference=SC70-5-419A-02, PackageVersion="Rev. L, 01/2013", Packing="Tape and Reel", PartNumber=NSB1706DMW5T1G, Polarity="Dual NPN", R1/R2 Typ=0.1, RoHS=TRUE, V(BR)CEO Min (V)=50
U3: library part CMP-04892-000058-1, "IC SWITCH DUAL SPDT 10MSOP", Case/Package=VSSOP, High Level Output Current=50mA, Max Operating Temperature=85°C, Max Supply Current=1uA, Max Supply Voltage=5.5V, Min Operating Temperature=-40°C, Min Supply Voltage=1.8V, On-State Resistance=10R, Package Quantity=1, Bandwidth=220MHz, Contact Plating=Gold, Height=1.02mm, Lead Free="Lead Free", Length=3mm, Low Level Output Current=50mA, Mount="Surface Mount", Number of Bits=2, Number of Channels=2, Number of Inputs=2, Number of Outputs=4, Number of Pins=10, Operating Supply Current=1uA, Packaging="Tape and Reel", Polarity=Non-Inverting, Radiation Hardening=No, Series=-, Supply Type=Single, Throw Configuration=SPDT, Turn-Off Delay Time=3.8ns, Turn-On Delay Time=5.7ns, Weight=0.000663oz, Width=3mm
U4: library part CMP-7264-000000-1, "General-purpose, dual-channel, 1/1 digital isolator 8-SOIC -40 to 125", Manufacturer_Name="Texas Instruments", Component Type=Standard, Copyright="Copyright (C) 2025 Ultra Librarian. All rights reserved.", Design Item ID=ISO6721BDR, Manufacturer_Part_Number=ISO6721BDR, Pin Count=8, RefDes=RefDes, Source=ISO6721BDR.SchLib, Type=Type

## Free pads (board coordinates)
  round 6 hole 3.2 unplated: 4(3.5,3.5) 4(3.5,56.5) 4(96.5,3.5) 4(96.5,56.5)

## Via types
v1: diameter 1.27, hole 0.7, Top Layer to Bottom Layer, tented both sides, 59 vias
v2: diameter 1.27, hole 0.7, Top Layer to Bottom Layer, 28 vias

## Nets (pads, with @x,y where several pads share a name; then routed paths per layer and width w, separated by ;. In a path a pad name is that pad's centre, name@x,y a point inside that pad or via, vN(x,y) a via of type N, cw(c..) or ccw(c..) an arc to the next point about the centre after c; other vN are vias at no path point)
+5: B1.1 C3.2 R1.2 R2.2 U1.3 U4.1 | length 98.2
  Top Layer w0.61: U4.1 17.145,5.207 16.51,5.842 16.51,10.702 C3.2 19.031,10.653 19.69,10.653 20.691,9.652 v2(20.828,9.652)
  Top Layer w0.762: U1.3 B1.1 ; v2(34,17) 34.097,16.903 35.047,16.903 R1.2 ; v2(35.966,8) 36.042,7.924 38.026,7.924 R2.2 ; v2(40.64,33.02) v2(40.64,43.18)
  Bottom Layer w0.762: v2(20.828,9.652) 20.828,6.422 25.75,1.5 33.25,1.5 34.29,2.54 34.29,6.324 v2(35.966,8) 34,9.966 v2(34,17) 40.64,23.64 v2(40.64,33.02) ; B1.1 35.598,50 40.543,45.055 40.543,43.277 v2(40.64,43.18)
+12: J3.1 J11.2 J11.4 J22.1 | length 25.4
  Top Layer w0.61: J11.2 8.846,36.024 9.652,36.83 9.652,40.552 9.1,41.104 ; J11.4 9.1,41.104 ; J3.1 J22.1 15.75,49.25 9.75,43.25 9.75,41.754 9.1,41.104
"+Batter Input": J4.5 J5.1 J5.2 Q5.3 R5.2 R6.1 R18.2 | length 106.8
  Top Layer w0.61: v2(36,55) 62.348,55 65.262,52.086 R5.2 66.636,48.426 67.819,47.243 68.807,47.243 R6.1 73.352,47.05 J5.1 ; Q5.3 64.612,22.612 66,24 72.266,24 73,23.266 ; R18.2 73,23.266 ; J5.2 J5.1 ; v2(75.896,26.162) 73,23.266 ; v2(75.946,34.29) 75.919,34.317 75.919,49.564 J5.1
  Bottom Layer w0.61: J4.5 20.018,57.5 22.518,55 v2(36,55) ; v2(75.896,26.162) 75.921,26.187 75.921,34.265 v2(75.946,34.29)
GND: B1.2 C1.1 C2.1 C3.1 D5.2 D7.2 J4.3 J11.1 J11.3 J11.5 Q2.2 Q3.4 Q4.4 R7.1 R9.1 R12.1 R13.1 R14.2 R15.2 R16.2 R17.2 R21.1 R23.1 U1.2 U2.2 U3.3 U4.4 | length 0.6
  Top Layer w0.254: R23.1@63,2 63.285,2.285 R23.1
  other v1: 12.5,2 17.5,2 22.5,2 37.5,2.5 42.5,2.5 58.75,2.5 67.5,2.5 72.5,2.5 83.75,2.5 80,10 2.5,12.5 97.5,12.5 20,15 45,15 50,15 85,15 2.5,17.5 30.5,17.5 97.5,17.5 20,20 80,20 2.5,22.5 97.5,22.5 15,25 20,25 55,25 2.5,27.5 97.5,27.5 55,30 2.5,32.5 97.5,32.5 25,35 60,35 70,35 80,35 2.5,37.5 97.5,37.5 2.5,42.5 97.5,42.5 80,45 2.5,47.5 5.5,47.5 97.5,47.5 26.25,50 40,50 45,50 70,50 13.25,51 16.25,57.5 32.5,57.5 37.5,57.5 47.5,57.5 58.75,57.5 67.5,57.5 72.5,57.5 77.5,57.5 82.5,57.5 87.5,57.5
NetB1_3: B1.3 C2.2 SW1.1 SW1.3 SW1.5 U3.8 | length 55.4
  Top Layer w0.254: U3.8 11,55.851 11.149,56 v2(17.5,56) ; v2(36.068,29.972) 36.068,25.932 37,25 37,22.858 SW1.1 SW1.3 SW1.5
  Bottom Layer w0.254: v2(17.5,56) 19.25,56 21.402,53.848 25.908,53.848 25.982,53.774 32.258,47.498 32.258,45.72 32.788,45.19 33.73,45.19 B1.3 36.068,42.852 v2(36.068,29.972)
NetB1_4: B1.4 U3.4 | length 34
  Top Layer w0.254: v2(10,52.5) 11.25,52.5 11.5,52.25 U3.4
  Bottom Layer w0.254: v2(10,52.5) 10,47.469 15.089,42.38 B1.4
NetB1_5: B1.5 U3.2 | length 33.8
  Top Layer w0.254: v2(8.75,49.75) 10.101,49.75 10.489,50.138 10.489,50.938 U3.2
  Bottom Layer w0.254: v2(8.75,49.75) 8.75,46.75 15.66,39.84 B1.5
NetB1_6: B1.6 R8.1 | length 24.2
  Top Layer w0.254: R8.1 23.95,31.95 29.3,37.3 B1.6
NetB1_7: B1.7 C1.2 D5.1 R5.1 R7.2 | length 40
  Top Layer w0.254: B1.7 37.24,38 v2(39,38) ; v2(45,43) 48.134,46.134 55.866,46.134 57.042,44.958 58.901,44.958 59.05,45.107 59.05,47.118 ; 59.056,47.118 59.056,47.956 C1.2 R7.2@59.1,50 ; R7.2 61.423,50.165 R5.1
  Bottom Layer w0.254: v2(39,38) 40,38 v2(45,43)
NetB1_8: B1.8 R19.2 | length 27.9
  Top Layer w0.254: B1.8 39.408,32.22 v2(42.164,29.464) ; R19.2 52.07,17.12 v2(52.07,22.86)
  Bottom Layer w0.254: v2(42.164,29.464) 45.466,29.464 v2(52.07,22.86)
NetB1_9: B1.9 B1.10 R14.1 R17.1 SW1.6 U3.1 U3.5 | length 81.2
  Top Layer w0.254: U3.1 9.551,50.949 v2(8.5,52) 8.5,52.989 8.873,53.362 10.889,53.362 12,52.251 U3.5 ; v2(27.686,29.718) R17.1@31.276,29.718 ; R17.1@31.496,29.684 31.5,29.68 B1.9 35.562,31.242 38.1,31.242 41.148,28.194 42.926,28.194 43.688,28.956 v2(43.688,30.734) ; SW1.6 49.216,20.294 49.276,20.354 49.24,20.39 B1.10
  Bottom Layer w0.254: v2(8.5,52) 7.597,51.097 7.597,46.259 24.137,29.718 v2(27.686,29.718) ; v2(43.688,30.734) 48.186,30.734 B1.10
NetB1_11: B1.11 R15.1 SW1.4 | length 12.8
  Top Layer w0.254: SW1.4 44.831,21.799 45.406,21.799 R15.1 ; R15.1@47.244,23.91 47.244,30.224 B1.11
NetB1_12: B1.12 R16.1 SW1.2 | length 13.9
  Top Layer w0.254: SW1.2 44.595,23.767 44.958,24.13 44.958,30.478 B1.12
NetB1_13: B1.13 U2.3 | length 49.5
  Top Layer w0.254: v2(29,26) 28.984,25.984 27.984,25.984 27,25 27,12 29,10 32.7,10 32.927,10.227 32.927,10.277 33,10.35 U2.3 U2.3@32.981,10.419
  Bottom Layer w0.254: v2(29,26) 35,26 38.354,29.354 38.354,32.766 42.888,37.3 B1.13
NetB1_14: B1.14 U2.1 | length 55.6
  Top Layer w0.254: v2(28,9) 26,11 26,25 v2(29,28) ; v2(30,12) 30.275,12 30.625,11.65 U2.1
  Bottom Layer w0.254: v2(28,9) 30,11 v2(30,12) ; v2(29,28) 29.194,28.194 36.068,28.194 37.592,29.718 37.592,33.528 44.064,40 49.08,40 B1.14
NetB1_15: B1.15 R11.1 | length 16.7
  Top Layer w0.254: B1.15 52.108,42.38 54.102,40.386 54.102,35.221 R11.1
NetB1_16: B1.16 R10.1 | length 10.2
  Top Layer w0.254: B1.16 55.884,44.92 R10.1
NetD1_1: D1.1 D3.2 U2.5 | length 23
  Top Layer w0.254: U2.5 36.531,11.65 36.881,12 39.547,12 D1.1@39.912,12.366 ; D1.1 D1.1@39.912,12.366 ; D3.2 51.904,4.826 49.53,4.826 42.238,12.118 40.16,12.118 D1.1@39.912,12.366
NetD1_2: D1.2 D3.1 R1.1 | length 23.7
  Top Layer w0.254: R1.1 39.005,15.045 39.005,14.898 39.639,14.264 39.664,14.264 39.912,14.016 D1.2 39.912,13.966 40.16,13.718 41.654,13.718 50.038,5.334 53.936,5.334 D3.1
NetD2_1: D2.1 D4.2 U2.4 | length 17
  Top Layer w0.254: U2.4 34.95,6.672 37.232,4.391 D2.1 45.339,4.391 D4.2
NetD2_2: D2.2 D4.1 R2.1 | length 12.6
  Top Layer w0.254: R2.1 40.203,6.413 40.16,6.37 40.16,6.239 D2.2 46.279,5.991 D4.1
NetD6_1: D6.1 Q6.3 | length 5.5
  Top Layer w0.254: D6.1 59.05,13.95 60,13 60,11.628 59.96,11.589 59.96,11.364 59.787,11.191 Q6.3
NetD6_3: D6.3 Q5.1 R18.1 | length 20.4
  Top Layer w0.61: D6.3 v2(63,18) ; v2(72,17) 71.856,17 69.212,19.644 Q5.1 69.269,19.95 R18.1
  Bottom Layer w0.61: v2(63,18) 71,18 v2(72,17)
NetD7_1: D7.1 Q6.1 R19.1 R21.2 | length 13.2
  Top Layer w0.254: D7.1 53.478,7.65 53.593,7.764 53.593,7.886 54,8.293 54,12.228 R21.2 ; R19.1 54.335,16.715 R21.2 ; Q6.1 54.758,12.141 R21.2
NetJ1_3: J1.3 U4.5 | length 6.4
  Top Layer w0.254: J1.3 10.238,11.611 12.832,9.017 U4.5
NetJ1_5: J1.5 U4.6 | length 12.8
  Top Layer w0.254: J1.5 14.478,10.125 14.478,7.896 14.329,7.747 U4.6
NetJ1_6: J1.6 U4.8 | length 20.1
  Top Layer w0.254: J1.6 6.726,19.231 6.25,18.755 6.25,8.75 7.25,7.75 10.289,7.75 12.832,5.207 U4.8@13,5.207
NetJ1_9: J1.9 U4.7 | length 24.8
  Top Layer w0.254: J1.9 15.24,19.523 15.24,7.366 14.351,6.477 U4.7
NetJ3_2: J3.2 U1.1 | length 11
  Top Layer w0.61: J3.2 20.29,52.63 U1.1
NetJ4_1: J4.1 Q1.5 Q1.6 Q1.7 Q1.8 | length 21.2
  Top Layer w0.61: 19.75,43.25 19.75,43.5 20,43.75 20,45.75 20.75,46.5 v2(24.5,46.5) ; v2(24.5,52.5) 24.626,52.626 25.396,52.626 30.12,57.35 J4.1
  Bottom Layer w0.61: v2(24.5,46.5) v2(24.5,52.5)
NetJ4_2: J4.2 U3.6 | length 16.7
  Top Layer w0.254: U3.6 25.281,55.051 27.58,57.35 J4.2
NetJ4_4: J4.4 U3.10 | length 16.1
  Top Layer w0.254: U3.10 10,57.5 11.25,58.75 21.4,58.75 22.5,57.65 J4.4
NetJ6_1: J6.1 J6.2 J7.1 | length 7.1
  Top Layer w0.61: J6.1 J6.2 80.434,52.197 84.777,52.197 J7.1
NetJ8_1: J8.1 J9.1 J9.2 | length 7.2
  Top Layer w0.61: J8.1 77.27,3.452 81.715,3.452 J9.2 J9.1
NetJ10_1: J10.1 Q4.1 Q4.2 Q4.5 Q4.6 | length 49.4
  Top Layer w0.254: Q4.5 64.347,28.218 Q4.5@64.5,28.371
  Top Layer w0.61: 66.376,29.21 81.79,29.21 91,20 91,5 89.389,3.389 J10.1
NetJ12_1: J12.1 U3.9 | length 83.8
  Top Layer w0.2: U3.9 10.5,56.21 11.25,56.96 v2(11.25,57) ; v1(15.5,3) 25.956,3 26.924,2.032 29.572,2.032 30.302,2.762 J12.1
  Bottom Layer w0.2: v2(11.25,57) 4.464,50.214 4.464,7.786 9.25,3 v1(15.5,3)
NetJ12_2: J12.2 U4.2 | length 13.5
  Top Layer w0.254: U4.2 18.85,6.35 21.59,6.35 23.121,4.819 29.819,4.819 J12.2
NetJ13_1: J13.1 U3.7 | length 78
  Top Layer w0.2: U3.7 11.5,54.25 14.25,51.5 14.25,50.25 9.5,45.5 7.25,45.5 5.5,43.75 5.5,7.25 8.75,4 27.46,4 J13.1
NetJ13_2: J13.2 U4.3 | length 10
  Top Layer w0.254: U4.3 24.765,7.747 26.512,6 J13.2
NetJ22_2: J22.2 Q1.1 Q1.2 Q1.3 R3.2 | length 13.4
  Top Layer w0.254: R3.2 14.582,42.05 15.622,43.09 Q1.3
  Top Layer w0.61: Q1.3 Q1.2 17.75,45.5 20.29,48.04 J22.2
NetQ1_4: Q1.4 R3.1 R4.1 | length 8.9
  Top Layer w0.254: R4.1 12,37.942 R3.1 14.977,39.95 17.458,42.43 Q1.4
NetQ2_1: Q2.1 R8.2 R9.2 | length 7.3
  Top Layer w0.254: R8.2 12.268,33.782 R9.2 16.984,35.818 Q2.1
NetQ2_3: Q2.3 R4.2 | length 4.1
  Top Layer w0.254: R4.2 14.283,38.125 Q2.3
NetQ3_1: Q3.1 Q3.2 Q3.5 Q3.6 R6.2 | length 8.4
  Top Layer w0.254: Q3.5 Q3.6 Q3.1 ; Q3.2 Q3.1 ; R6.2 66.446,42.396 Q3.1
NetQ3_3: Q3.3 R10.2 R12.2 | length 6.9
  Top Layer w0.254: R12.2 R10.2 ; R10.2@60.486,42.536 63.892,42.536 Q3.3
NetQ4_3: Q4.3 R11.2 R13.2 | length 7.4
  Top Layer w0.254: R13.2 58.739,28.453 58.739,29.021 59.942,30.224 59.942,30.73 R11.2
  Top Layer w0.61: R11.2 61.858,31.106 62.535,30.429 63.373,30.429 63.397,30.404 Q4.3
NetQ5_2: Q5.2 Q5.4 R20.2 | length 13.3
  Top Layer w0.61: Q5.2 Q5.4 67.812,13.594 70.335,11.071 R20.2
NetQ6_2: Q6.2 R22.1 R23.2 | length 10.9
  Top Layer w0.61: Q6.2 57.262,8.738 58.486,7.514 R22.1 R23.2
NetR20_1: R20.1 R22.2 | length 5.4
  Top Layer w0.61: R22.2 67.185,9.614 R20.1
pads on no net: B1.17 B1.18 D6.2 D7.3 J1.1 J1.2 J1.4 J1.7 J1.8 J2.1 J2.2 J2.3 J2.4 J2.5 J2.6 J2.7 J2.8 J2.9 J7.2 J8.2 J10.2

## Polygon pours and split planes (outlines as drawn)
GND on Top Layer "GND_L01_P007" (solid, remove dead copper, pour order 7): 0,60 100,60 100,0 0,0
NetJ10_1 on Top Layer "NETJ10" (solid, pour order 6): 64.008,32.004 67.31,32.004 67.31,26.416 64.008,26.416
GND on Bottom Layer "GND_L02_P008" (solid, remove dead copper, pour order 8): 100,60 100,0 0,0 0,60

## Silkscreen, mask and mechanical layers (free items; w line width, h text height)
Top Solder:
  text "Space Battery Test V1" at 38.754,57.762 h1.52
  text "Mode:" at 30.372,25.191 h1.1
  text "I" at 30.626,23.445 h1.1
  text "II" at 30.626,21.445 h1.1
  text "III" at 30.626,19.445 h1.1
Bottom Solder:
  text "2026" at 94.746,42.254 h1.52
  text "Eisner" at 94.746,39.254 h1.52
  text "Kueffel" at 94.746,36.254 h1.52
  text "Lometsch" at 94.746,33.254 h1.52
  text "Peniche" at 94.746,30.254 h1.52
Mechanical 1:
  region: 31.662,21.441 32.162,21.941
  lines w0.254: 0.127,0.127 0.127,60 100,60 100,0.127 0.127,0.127

## Text inside footprints (layer, text, board x,y; h text height)
J3: Top Assembly "1" at 15.85,52.25 h1
J5: Top Assembly "1" at 76.392,47.691 h1 r90
J6: Top Assembly "1" at 80.868,47.691 h1 r90
J7: Top Assembly "1" at 84.342,54.162 h1 r270
J8: Top Assembly "1" at 77.706,1.489 h1 r90
J9: Top Assembly "1" at 81.278,7.956 h1 r270
J10: Top Assembly "1" at 86.596,1.489 h1 r90
J12: Top Assembly "1" at 31.5,1.56 h1 r90
J13: Top Assembly "1" at 28.5,1.56 h1 r90
J22: Top Assembly "1" at 15.85,48.75 h1
U4: Top Overlay "*" at 19.295,4.776 h1.27 r180; Mechanical 13 "*" at 17.932,5.956 h1.27 r180